# EAGLE board regulator_sot223 (EAGLE 9.6.2)
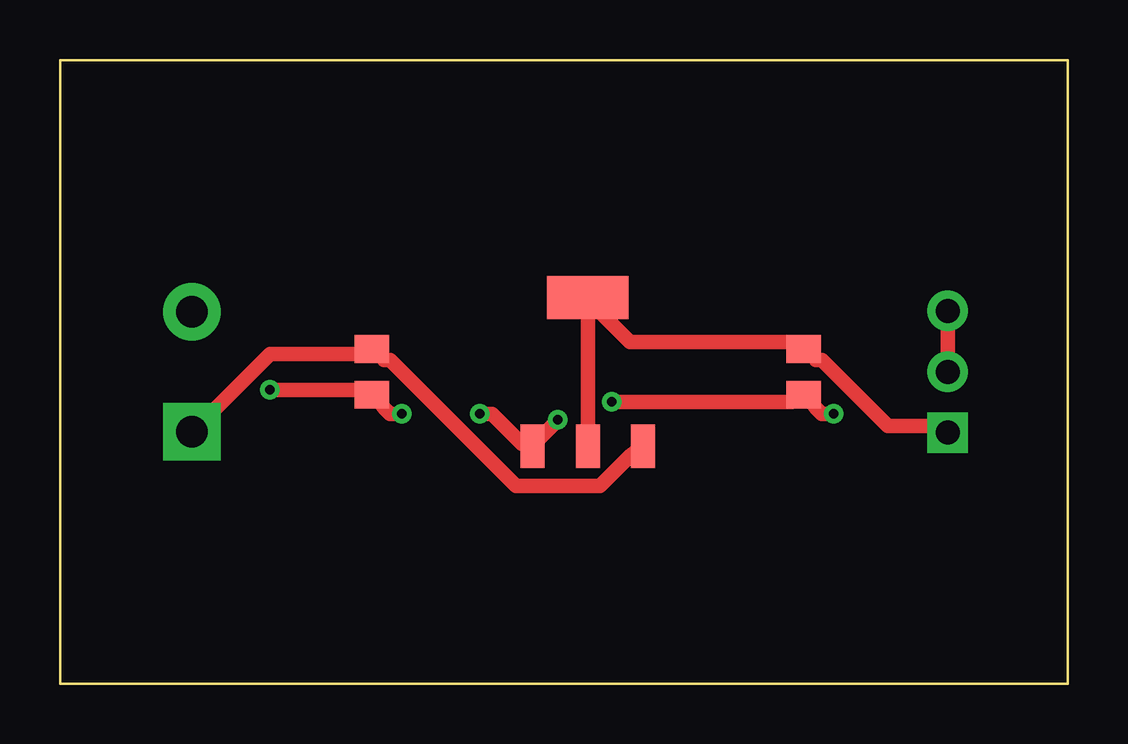
[diagram p0: board, top side]
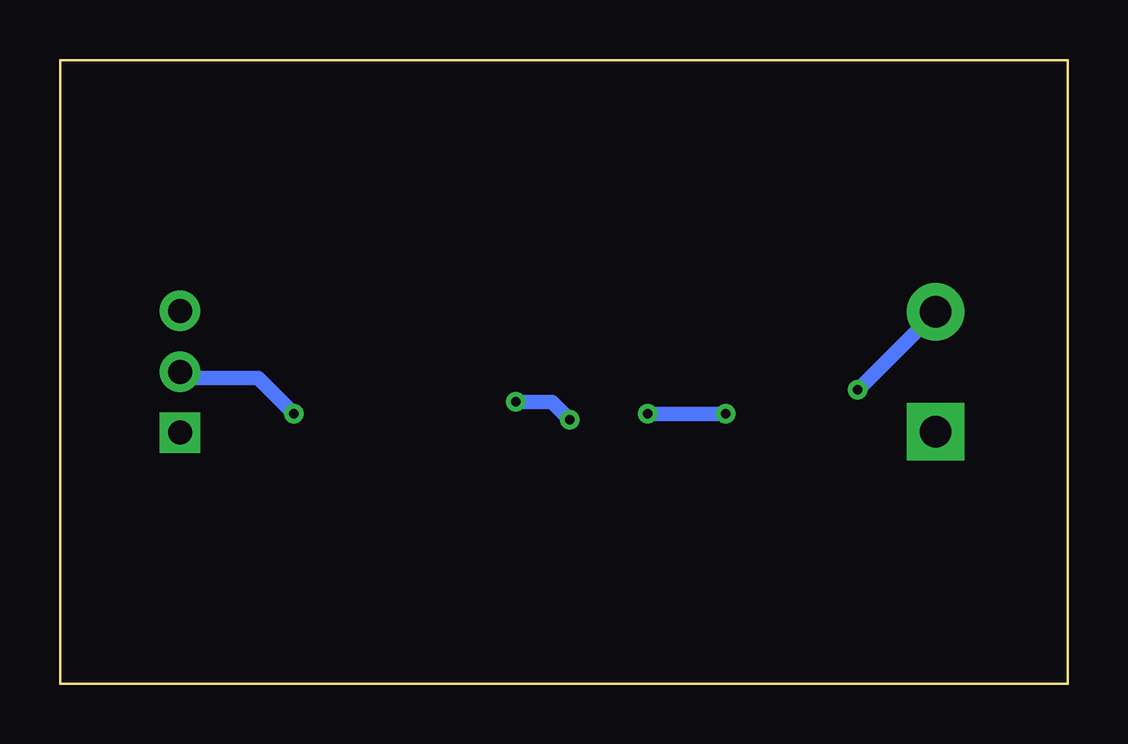
[diagram p1: board, bottom side, seen from below]

Size 42 x 26 mm. Coordinates in mm from the lower left corner, seen from the top.
Outline: 0,0 42,0 42,26 0,26 0,0
Copper layers used: Top, Bottom
Design rules "eh3d-kit": minimum track width 0.15mm, minimum drill 0.3mm, track to track 0.15mm, track to pad 0.15mm, pad to pad 0.15mm, via to via 0.15mm, smd to smd 0.15mm, copper to edge 0.3mm, drill to drill 0.25mm, minimum pad ring 0.15mm, minimum via ring 0.15mm

## Footprints (pad centres in the part's own frame; a part is rotated, then mirrored left to right if it is on the bottom)
CHIP-0805 = smd 1.15 x 1.45: 1 -0.95,0; 2 0.95,0
HDR-1X03 = drill 1 pad 1.7 square: 1 -2.54,0 | drill 1 pad 1.7: 2 0,0; 3 2.54,0
SOT-223 = smd 1 x 1.8: 1 -2.3,-3.1; 2 0,-3.1; 3 2.3,-3.1 | smd 3.4 x 1.8: 4 0,3.1
TERM-2P-5.0 = drill 1.3 pad 2.4 square: 1 -2.5,0 | drill 1.3 pad 2.4: 2 2.5,0

## Placement (x,y rotation side)
C1  10u  [CHIP-0805]  13,13 90 top
C2  22u  [CHIP-0805]  31,13 90 top
J1  OUT  [HDR-1X03]  37,13 90 top
U1  REG  [SOT-223]  22,13 0 top
X1  IN  [TERM-2P-5.0]  5.5,13 90 top

## Library data of the parts
C1 C2 J1 U1 X1 = eh3d-kit

## Nets
GND: C1.1 C2.1 J1.2 J1.3 U1.1 X1.2
VIN: C1.2 U1.3 X1.1
VOUT: C2.2 J1.1 U1.2 U1.4

## Tracks (layer width: path | path; a pad name or v marks a point on that pad's centre or on a via)
GND  (via drill 0.4 pad 0.8)
  Top 0.6: v8.75,12.25 12.5,12.25 C1.1 13.5,11.5 13.75,11.25 v14.25,11.25 | v17.5,11.25 18,11.25 19.25,10 U1.1 20.25,10.5 v20.75,11 | v23,11.75 30.5,11.75 C2.1 31.5,11.5 31.75,11.25 v32.25,11.25 | J1.3 J1.2
  Bottom 0.6: v8.75,12.25 X1.2 | v17.5,11.25 v14.25,11.25 | v23,11.75 21.5,11.75 v20.75,11 | J1.2 36.5,12.75 33.75,12.75 v32.25,11.25
VIN
  Top 0.6: X1.1 8.75,13.75 12.5,13.75 C1.2 13.5,13.5 13.75,13.5 19,8.25 22.5,8.25 23.75,9.5 U1.3
VOUT
  Top 0.6: U1.2 U1.4 22.5,15.5 23.75,14.25 30.5,14.25 C2.2 31.5,13.5 31.75,13.5 34.5,10.75 36.5,10.75 J1.1